# Altium PCB NB3000XN.PcbDoc (part 56 of 71)
Units mil, origin at the board's own origin, x right, y up, seen from the top; angles counter-clockwise.
Board outline 9527.56 x 6929.77 mil, 6 copper layers (Top Layer, GND+SHIELD, MidLayer1, MidLayer2, P2 - 3V3+5V0, Bottom Layer), stack 62.375 mil thick; 832 components, 1027 nets, 4655 pads, 4981 vias.
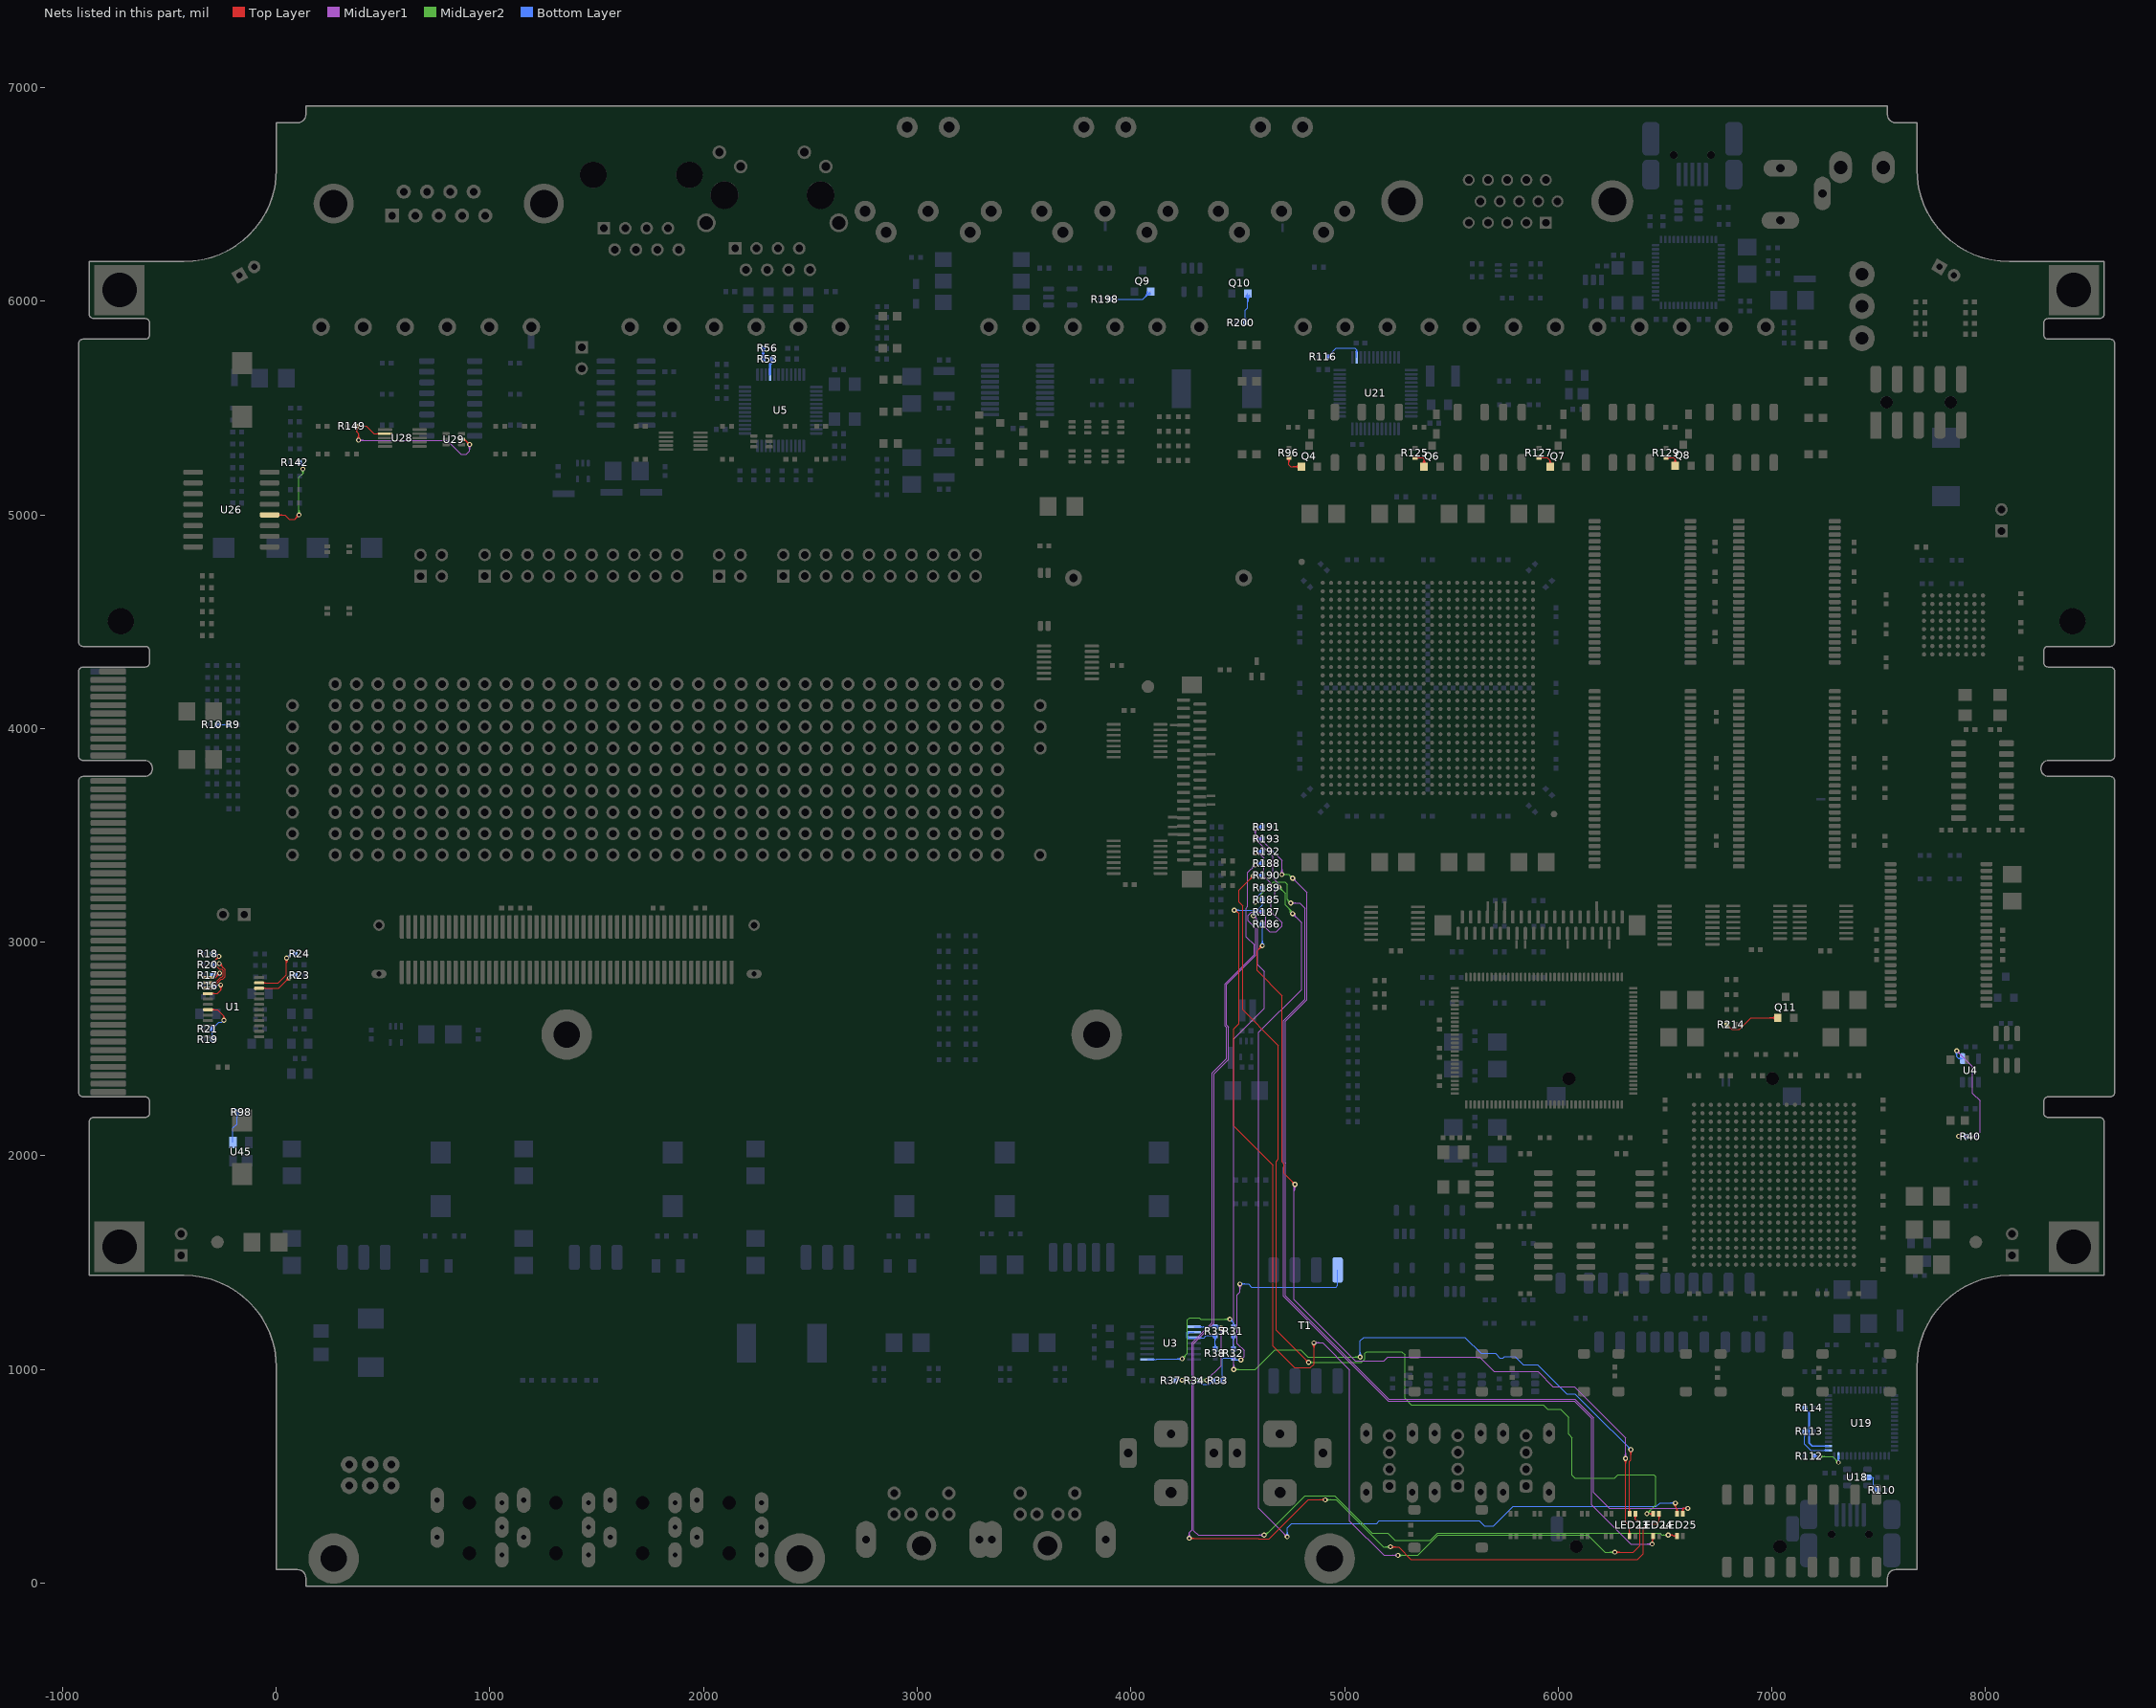
[diagram p60: the nets of this part, all layers, seen from the top]

## Via types
v1: diameter 23, hole 11.81, Top Layer to Bottom Layer, 3672 vias
v2: diameter 26, hole 11.81, Top Layer to Bottom Layer, 461 vias
v3: diameter 19, hole 11.81, Top Layer to Bottom Layer, tented both sides, 396 vias
v4: diameter 23.62, hole 11.81, Top Layer to Bottom Layer, 288 vias
v5: diameter 20, hole 11.81, Top Layer to Bottom Layer, 91 vias
v6: diameter 23, hole 11.81, Top Layer to Bottom Layer, tented both sides, 50 vias
v7: diameter 31, hole 11.81, Top Layer to Bottom Layer, 15 vias
v8: diameter 27.56, hole 11.81, Top Layer to Bottom Layer, tented both sides, 4 vias
v9: diameter 29, hole 11.81, Top Layer to Bottom Layer, 3 vias
v10: diameter 21, hole 11.81, Top Layer to Bottom Layer, 1 vias

## Nets (pads, with @x,y where several pads share a name; then routed paths per layer and width w, separated by ;. In a path a pad name is that pad's centre, name@x,y a point inside that pad or via, vN(x,y) a via of type N, cw(c..) or ccw(c..) an arc to the next point about the centre after c; other vN are vias at no path point) (continued)
NetLED23_1: LED23.1 R185.1 | length 5760.9
  Top Layer w4: v1(4483.52,3150.04) 4490.19,3150.04 4507.19,3133.04 4507.19,2620.02 4481.86,2594.69 4481.86,2138.73 4664.71,1955.87 4664.71,1108.85 4765.19,1008.37 4840.19,1008.37 4856.86,1025.04 v1(4856.86,1125.04) ; v1@4483.55,3148.54 cw(c4483.89,3129.71) 4497.2,3143.03 ; v1@4483.62,3144.54 cw(c4484.12,3116.63) 4503.86,3136.37 ; v1@4493.02,3150.04 ccw(c4499.87,3150.04) 4495.03,3145.2 ; v1@4850.14,1118.32 cw(c4833.92,1102.11) 4856.86,1102.11 cw(c4879.79,1102.11) v1@4863.57,1118.32 ; v1@4852.97,1121.15 cw(c4843.58,1111.76) 4856.86,1111.76 cw(c4870.14,1111.76) v1@4860.75,1121.15 ; v1(6265,145) 6351.86,145 6381.86,175 6381.86,285 6371.86,295 6365,295 6360.79,299.21 LED23.1@6360.79,324.21 ; v1@6268.89,141.11 cw(c6278.28,131.72) 6278.28,145 cw(c6278.28,158.28) v1@6268.89,148.89 ; v1@6271.72,138.28 cw(c6287.93,122.06) 6287.93,145 cw(c6287.93,167.93) v1@6271.72,151.72 ; LED23.1@6355.94,314.44 cw(c6344.23,302.73) 6360.79,302.73 cw(c6377.35,302.73) LED23.1@6365.64,314.44
  MidLayer1 w4: v1(4856.86,1125.04) 4897.92,1125.04 5024.19,998.77 5024.19,290.81 5185,130 v1(5250,130) ; v1@4860.75,1121.15 cw(c4870.14,1111.76) 4870.14,1125.04 cw(c4870.14,1138.32) v1@4860.75,1128.93 ; v1@4863.57,1118.32 cw(c4879.79,1102.11) 4879.79,1125.04 cw(c4879.79,1147.98) v1@4863.57,1131.76 ; v1@5243.28,123.28 ccw(c5227.06,107.06) 5227.06,130 ccw(c5227.06,152.93) v1@5243.28,136.72 ; v1@5246.11,126.11 ccw(c5236.72,116.72) 5236.72,130 ccw(c5236.72,143.28) v1@5246.11,133.89
  MidLayer2 w4: v1(5250,130) 5342.78,130 5438.48,225.71 6139.29,225.71 6220,145 v1(6265,145) ; v1@5253.89,126.11 cw(c5263.28,116.72) 5263.28,130 cw(c5263.28,143.28) v1@5253.89,133.89 ; v1@5256.72,123.28 cw(c5272.93,107.06) 5272.93,130 cw(c5272.93,152.93) v1@5256.72,136.72 ; v1@6258.28,138.28 ccw(c6242.06,122.06) 6242.06,145 ccw(c6242.06,167.93) v1@6258.28,151.72 ; v1@6261.11,141.11 ccw(c6251.72,131.72) 6251.72,145 ccw(c6251.72,158.28) v1@6261.11,148.89
  Bottom Layer w4: v1(4483.52,3150.04) 4590.19,3150.04 4615.19,3175.04 ; v1@4487.41,3146.15 cw(c4496.8,3136.76) 4496.8,3150.04 cw(c4496.8,3163.32) v1@4487.41,3153.93 ; v1@4490.24,3143.32 cw(c4506.46,3127.11) 4506.46,3150.04 cw(c4506.46,3172.98) v1@4490.24,3156.76 ; R185.1@4607.75,3191.19 cw(c4593.87,3175) 4615.19,3175 ; R185.1@4610.36,3194.22 cw(c4601.33,3183.7) 4615.19,3183.7 ; R185.1@4613.82,3198.75 4613.82,3200.04 R185.1@4615.19,3200.04 ; 4615.19,3179.07 cw(c4633.01,3179.07) R185.1@4620.41,3191.67 ; R185.1@4615.19,3198.75 4615.19,3175.04
NetLED23_3: LED23.3 R186.1 | length 4572.2
  Top Layer w4: v1@4605.69,2983.37 cw(c4582.76,2983.37) 4598.97,2967.16 cw(c4615.19,2950.94) v1@4615.19,2973.87 ; v1@4609.69,2983.37 cw(c4596.41,2983.37) 4605.8,2973.99 cw(c4615.19,2964.6) v1@4615.19,2977.87 ; v1(4615.19,2983.37) 4590.19,2958.37 4590.19,2866.71 4706.86,2750.04 4706.86,1971.86 4716.34,1962.38 4716.34,1918.56 v1(4768.19,1866.71) ; v1@4758.69,1866.71 ccw(c4735.76,1866.71) 4751.97,1882.93 ccw(c4768.19,1899.14) v1@4768.19,1876.21 ; v1@4762.69,1866.71 ccw(c4749.41,1866.71) 4758.8,1876.1 ccw(c4768.19,1885.49) v1@4768.19,1872.21 ; v1@6308.47,576.66 cw(c6292.26,560.44) 6315.19,560.44 cw(c6338.13,560.44) v1@6321.91,576.66 ; v1@6311.3,579.49 cw(c6301.91,570.1) 6315.19,570.1 cw(c6328.47,570.1) v1@6319.08,579.49 ; v1(6315.19,583.37) 6315.19,285 6333.59,266.6 LED23.3@6333.59,220.81 ; LED23.3@6328.74,230.58 ccw(c6317.03,242.29) 6333.59,242.29 ccw(c6350.15,242.29) LED23.3@6338.44,230.58
  MidLayer1 w4: v1@4761.47,1859.99 cw(c4753.69,1852.21) 4764.7,1852.21 ; 4764.7,1835.34 cw(c4799.56,1835.34) v1@4774.91,1859.99 ; 4764.7,1844.99 cw(c4789.9,1844.99) v1@4772.08,1862.82 ; 4764.7,1854.65 cw(c4780.25,1854.65) v1@4769.25,1865.65 ; v1(4768.19,1866.71) 4764.7,1863.21 4764.7,1326.14 5049.96,1040.87 5185.69,1040.87 5202.62,1057.81 5632.19,1057.81 5700,990 5905,990 5975,920 6075,920 6314.69,680.31 6314.69,583.87 v1(6315.19,583.37) ; v1@6308.47,590.09 ccw(c6293.46,605.1) 6314.69,605.1 ; v1@6311.3,587.26 ccw(c6303.12,595.45) 6314.69,595.45 ; 6314.69,597.86 ccw(c6329.68,597.86) v1@6319.08,587.26 ; 6314.69,607.52 ccw(c6339.33,607.52) v1@6321.91,590.09
  Bottom Layer w4: R186.1@4607.23,3077.92 cw(c4588.01,3058.7) 4615.19,3058.7 ; v1@4608.47,2990.09 ccw(c4592.26,3006.31) 4615.19,3006.31 ccw(c4638.13,3006.31) v1@4621.91,2990.09 ; R186.1@4610.06,3080.75 cw(c4597.67,3068.36) 4615.19,3068.36 ; v1@4611.3,2987.26 ccw(c4601.91,2996.65) 4615.19,2996.65 ccw(c4628.47,2996.65) v1@4619.08,2987.26 ; R186.1@4613.82,3085 4613.82,3084.51 4615.19,3084.51 v1(4615.19,2983.37) ; 4615.19,3065.32 cw(c4633.01,3065.32) R186.1@4620.41,3077.92
NetLED23_4: LED23.4 R187.1 | length 5308.4
  Top Layer w4: LED23.4@6328.84,333.98 ccw(c6317.81,345.01) 6333.41,345.01 ; LED23.4@6333.41,321.33 6333.41,570 6340.19,576.78 v1(6340.19,625.04) ; 6333.41,346.36 ccw(c6350.92,346.36) LED23.4@6338.54,333.98 ; v1@6333.47,618.32 cw(c6317.26,602.11) 6340.19,602.11 cw(c6363.13,602.11) v1@6346.91,618.32 ; v1@6336.3,621.15 cw(c6326.91,611.76) 6340.19,611.76 cw(c6353.47,611.76) v1@6344.08,621.15
  MidLayer1 w4: v1@4475.14,1006.76 ccw(c4458.92,1022.98) 4481.86,1022.98 ccw(c4504.79,1022.98) v1@4488.57,1006.76 ; v1@4477.97,1003.93 ccw(c4468.58,1013.32) 4481.86,1013.32 ccw(c4495.14,1013.32) v1@4485.75,1003.93 ; v1(4481.86,1000.04) 4481.86,2547.67 4623.86,2689.67 4623.86,2864.04 4593.19,2894.71 4593.19,3104.04 v1(4573.52,3123.71) ; v1@4573.52,3114.21 cw(c4573.52,3091.27) 4589.74,3107.49 cw(c4605.96,3123.71) v1@4583.02,3123.71 ; v1@4573.52,3118.21 cw(c4573.52,3104.93) 4582.91,3114.32 cw(c4592.3,3123.71) v1@4579.02,3123.71
  MidLayer2 w4: v1(4481.86,1000.04) 4583.19,1000.04 4674.86,1091.71 4795.54,1091.71 4828.88,1058.37 v1(5073.52,1058.37) ; v1@4485.75,996.15 cw(c4495.14,986.76) 4495.14,1000.04 cw(c4495.14,1013.32) v1@4485.75,1003.93 ; v1@4488.57,993.32 cw(c4504.79,977.11) 4504.79,1000.04 cw(c4504.79,1022.98) v1@4488.57,1006.76 ; v1@5066.81,1051.66 ccw(c5050.59,1035.44) 5050.59,1058.37 ccw(c5050.59,1081.31) v1@5066.81,1065.09 ; v1@5069.64,1054.49 ccw(c5060.25,1045.1) 5060.25,1058.37 ccw(c5060.25,1071.65) v1@5069.64,1062.26
  Bottom Layer w4: v1(4573.52,3123.71) 4591.69,3141.87 ; v1@4573.52,3129.21 ccw(c4573.52,3142.49) 4582.91,3133.1 ccw(c4592.3,3123.71) v1@4579.02,3123.71 ; v1@4573.52,3133.21 ccw(c4573.52,3156.14) 4589.74,3139.93 ccw(c4605.96,3123.71) v1@4583.02,3123.71 ; R187.1@4607.15,3135.36 ccw(c4591.69,3120.26) 4591.69,3141.87 ; R187.1@4607.15,3148.39 cw(c4591.69,3163.48) 4591.69,3141.87 ; R187.1@4610.01,3138.16 ccw(c4601.19,3129.54) 4601.19,3141.87 ccw(c4601.19,3154.21) R187.1@4610.01,3145.59 ; R187.1@4613.82,3141.88 4591.69,3141.87 ; v1@5066.81,1065.09 ccw(c5050.59,1081.31) 5073.52,1081.31 ccw(c5096.46,1081.31) v1@5080.24,1065.09 ; v1@5069.64,1062.26 ccw(c5060.25,1071.65) 5073.52,1071.65 ccw(c5086.8,1071.65) v1@5077.41,1062.26 ; v1(5073.52,1058.37) 5073.52,1133.52 5090,1150 5564.02,1150 5639.02,1075 5705.79,1075 5727.75,1053.04 5742.25,1053.04 5749.43,1060.22 5798.44,1060.22 5835.66,1023 5903.31,1023 6039.86,886.46 6078.78,886.46 6156.86,808.37 v1(6340.19,625.04) ; v1@6330.69,625.04 ccw(c6307.76,625.04) 6323.97,641.26 ccw(c6340.19,657.48) v1@6340.19,634.54 ; v1@6334.69,625.04 ccw(c6321.41,625.04) 6330.8,634.43 ccw(c6340.19,643.82) v1@6340.19,630.54
NetLED24_1: LED24.1 R188.1 | length 6494.6
  Top Layer w4: v1(4273.52,210) 4595,210 4598.57,206.43 4646.58,206.43 4830.15,390 v4(4910,390) ; v1@4277.41,206.11 cw(c4286.8,196.72) 4286.8,210 cw(c4286.8,223.28) v1@4277.41,213.89 ; v1@4280.24,203.28 cw(c4296.46,187.06) 4296.46,210 cw(c4296.46,232.93) v1@4280.24,216.72 ; v4@4903.06,383.06 ccw(c4886.31,366.31) 4886.31,390 ccw(c4886.31,413.69) v4@4903.06,396.94 ; v4@4905.89,385.89 ccw(c4895.97,375.97) 4895.97,390 ccw(c4895.97,404.03) v4@4905.89,394.11 ; v4(5215,170) 5253.14,170 5311.14,112 6372,112 6398.19,138.19 6398.19,258.19 6417.07,277.07 6458.89,277.07 6472.22,290.4 LED24.1@6472.22,321.33 ; v4@5219.11,165.89 cw(c5229.03,155.97) 5229.03,170 cw(c5229.03,184.03) v4@5219.11,174.11 ; v4@5221.94,163.06 cw(c5238.69,146.31) 5238.69,170 cw(c5238.69,193.69) v4@5221.94,176.94 ; LED24.1@6467.19,314.44 cw(c6455.05,302.3) 6472.22,302.3 ; 6472.22,303.16 cw(c6488.16,303.16) LED24.1@6476.89,314.44
  MidLayer1 w4: v1@4266.81,216.72 ccw(c4250.59,232.93) 4273.52,232.93 ccw(c4296.46,232.93) v1@4280.24,216.72 ; v1@4269.64,213.89 ccw(c4260.25,223.28) 4273.52,223.28 ccw(c4286.8,223.28) v1@4277.41,213.89 ; v1(4273.52,210) 4273.52,236.9 4286,249.37 4286,1124.69 4381.52,1220.21 4381.52,2388 4448.52,2455 4448.52,2600.04 4440.19,2608.37 4440.19,2804.71 4577.19,2941.71 4577.19,2988.04 4540.19,3025.04 4540.19,3159.71 4547.19,3166.71 4547.19,3326.37 v1(4581.86,3361.04) ; v1@4572.36,3361.04 cw(c4549.42,3361.04) 4565.64,3344.82 cw(c4581.86,3328.61) v1@4581.86,3351.54 ; v1@4576.36,3361.04 cw(c4563.08,3361.04) 4572.47,3351.65 cw(c4581.86,3342.26) v1@4581.86,3355.54
  MidLayer2 w4: v4(4910,390) 4961.55,390 5181.55,170 v4(5215,170) ; v4@4914.11,385.89 cw(c4924.03,375.97) 4924.03,390 cw(c4924.03,404.03) v4@4914.11,394.11 ; v4@4916.94,383.06 cw(c4933.69,366.31) 4933.69,390 cw(c4933.69,413.69) v4@4916.94,396.94 ; v4@5208.06,163.06 ccw(c5191.31,146.31) 5191.31,170 ccw(c5191.31,193.69) v4@5208.06,176.94 ; v4@5210.89,165.89 ccw(c5200.97,155.97) 5200.97,170 ccw(c5200.97,184.03) v4@5210.89,174.11
  Bottom Layer w4: v1@4579.73,3362.35 cw(c4592.31,3354.59) 4592.31,3369.37 ; v1(4581.86,3361.04) 4590.19,3369.37 R188.1@4613.82,3369.38 ccw(c4613.82,3341.32) v1@4589.94,3356.05 ; v1@4583.13,3360.25 cw(c4599.48,3350.17) 4599.48,3369.37 ; v1@4586.54,3358.15 cw(c4606.65,3345.74) R188.1@4606.65,3369.37 ; R188.1@4607.23,3362.79 ccw(c4591.32,3346.88) 4591.32,3369.37 ccw(c4591.32,3391.87) R188.1@4607.23,3375.96 ; R188.1@4610.06,3365.61 ccw(c4600.98,3356.53) 4600.98,3369.37 ccw(c4600.98,3382.22) R188.1@4610.06,3373.14
NetLED24_3: LED24.3 R189.1 | length 5102.6
  Top Layer w4: v1@6436.3,187.26 ccw(c6426.91,196.65) 6440.19,196.65 ccw(c6453.47,196.65) v1@6444.08,187.26 ; v1(6440.19,183.37) 6440.19,200 6444.84,204.65 ; LED24.3@6441.7,209.79 cw(c6439.06,204.65) 6444.84,204.65 ; LED24.3@6443.31,222.34 LED24.3@6444.66,223.69 ; LED24.3@6444.84,220.81 6444.84,204.65 ; LED24.3@6447.97,209.79 ccw(c6450.62,204.65) 6444.84,204.65
  MidLayer1 w4: v1(4748.52,3183.37) 4790.52,3183.37 4815.52,3158.37 4815.52,2733.37 4715.19,2633.04 4715.19,1963.52 4716.34,1962.38 4716.34,1947.62 4715.19,1946.48 4715.19,1341.71 5095.75,961.15 5204.9,852 6075.37,852 6156.86,770.52 6156.86,366.71 6340.19,183.37 v1(6440.19,183.37) ; v1@4752.41,3179.49 cw(c4761.8,3170.1) 4761.8,3183.37 cw(c4761.8,3196.65) v1@4752.41,3187.26 ; v1@4755.24,3176.66 cw(c4771.46,3160.44) 4771.46,3183.37 cw(c4771.46,3206.31) v1@4755.24,3190.09 ; v1@6433.47,176.66 ccw(c6417.26,160.44) 6417.26,183.37 ccw(c6417.26,206.31) v1@6433.47,190.09 ; v1@6436.3,179.49 ccw(c6426.91,170.1) 6426.91,183.37 ccw(c6426.91,196.65) v1@6436.3,187.26
  MidLayer2 w4: v1(4581.86,3187.37) 4609.24,3214.75 4609.24,3223.11 4668.5,3282.37 4720.21,3282.37 4731.52,3271.06 4731.52,3200.37 v1(4748.52,3183.37) ; v1@4581.86,3192.87 ccw(c4581.86,3206.15) 4591.25,3196.76 ccw(c4600.64,3187.37) v1@4587.36,3187.37 ; v1@4581.86,3196.87 ccw(c4581.86,3219.81) 4598.07,3203.59 ccw(c4614.29,3187.37) v1@4591.36,3187.37 ; v1@4739.02,3183.37 ccw(c4716.09,3183.37) 4732.31,3199.59 ccw(c4748.52,3215.81) v1@4748.52,3192.87 ; v1@4743.02,3183.37 ccw(c4729.75,3183.37) 4739.14,3192.76 ccw(c4748.52,3202.15) v1@4748.52,3188.87
  Bottom Layer w4: v1@4577.1,3195.6 ccw(c4572.32,3203.85) 4581.86,3203.85 ; v1(4581.86,3187.37) 4581.86,3203.85 ; v1@4586.62,3195.6 cw(c4591.4,3203.85) 4581.86,3203.85 ; R189.1@4608.02,3247.84 cw(c4598.46,3235.81) 4613.82,3235.81 ; R189.1@4613.82,3255.62 4613.82,3235.81 ; R189.1@4619.62,3247.84 ccw(c4629.18,3235.81) 4613.82,3235.81 ; 4581.86,3203.85 4613.82,3235.81
NetLED24_4: LED24.4 R190.1 | length 5308.6
  Top Layer w4: v1@4564.02,3310.04 cw(c4541.09,3310.04) 4557.31,3293.82 cw(c4573.52,3277.61) v1@4573.52,3300.54 ; v1@4568.02,3310.04 cw(c4554.75,3310.04) 4564.14,3300.65 cw(c4573.52,3291.26) v1@4573.52,3304.54 ; v1(4573.52,3310.04) 4506.52,3243.04 4506.52,3188.04 4523.52,3171.04 4523.52,2683.37 4669.72,2537.18 4690.52,2516.37 4690.52,1984.48 4680.71,1974.66 4680.71,1184.52 v1(4831.86,1033.37) ; v1@4822.36,1033.37 ccw(c4799.42,1033.37) 4815.64,1049.59 ccw(c4831.86,1065.81) v1@4831.86,1042.87 ; v1@4826.36,1033.37 ccw(c4813.08,1033.37) 4822.47,1042.76 ccw(c4831.86,1052.15) v1@4831.86,1038.87 ; v1(6415.19,325.04) 6429.96,325.04 6430.79,324.21 ; LED24.4@6439.55,319.96 ccw(c6430.79,313.05) 6430.79,324.21 ; LED24.4@6439.55,328.45 cw(c6430.79,335.36) 6430.79,324.21 ; LED24.4@6444.94,324.21 6430.79,324.21
  MidLayer2 w4: v1(4831.86,1033.37) 5080,1033.37 5095,1048.37 5095,1075 5103.37,1083.37 5267.56,1083.37 5282.19,1068.75 5282.19,864.67 5311.98,834.87 5930.13,834.87 5950,815 6010,815 6048.65,776.35 6048.65,696.54 6065.19,680 6065.19,505.04 6078.52,491.71 6263.86,491.71 6280.52,508.37 6446.86,508.37 6456.86,498.37 6456.86,366.71 v1(6415.19,325.04) ; v1@4835.75,1029.49 cw(c4845.14,1020.1) 4845.14,1033.37 cw(c4845.14,1046.65) v1@4835.75,1037.26 ; v1@4838.57,1026.66 cw(c4854.79,1010.44) 4854.79,1033.37 cw(c4854.79,1056.31) v1@4838.57,1040.09 ; 6424.58,334.43 cw(c6415.19,343.82) 6415.19,330.54 ccw(c6415.19,343.82) 6424.58,334.43 ; 6424.58,334.43 ccw(c6433.97,325.04) 6420.69,325.04 cw(c6433.97,325.04) 6424.58,334.43 ; 6431.41,341.26 cw(c6415.19,357.48) 6415.19,334.54 ccw(c6415.19,357.48) 6431.41,341.26 ; 6431.41,341.26 ccw(c6447.63,325.04) 6424.69,325.04 cw(c6447.63,325.04) 6431.41,341.26
  Bottom Layer w4: v1(4573.52,3310.04) 4580.19,3310.04 4582.65,3312.5 R190.1@4613.82,3312.5 ; v1@4577.41,3306.15 cw(c4592.74,3290.83) 4592.74,3312.5 ; v1@4580.24,3303.32 cw(c4602.4,3281.17) 4602.4,3312.5 ; v1@4580.24,3316.76 ccw(c4590.52,3327.04) 4590.52,3312.5 ; R190.1@4607.23,3305.91 ccw(c4591.32,3290) 4591.32,3312.5 ccw(c4591.32,3335) R190.1@4607.23,3319.09 ; R190.1@4610.06,3308.74 ccw(c4600.98,3299.66) 4600.98,3312.5 ccw(c4600.98,3325.34) R190.1@4610.06,3316.26
NetLED25_1: LED25.1 R191.1 | length 5492.9
  Top Layer w4: LED25.1@6578.43,333.98 ccw(c6566.73,345.69) 6583.28,345.69 ccw(c6599.84,345.69) LED25.1@6588.13,333.98 ; LED25.1@6583.28,324.21 6583.28,348.19 6585.13,350.04 ; v1@6599.88,343.59 ccw(c6585.13,329.95) 6585.13,350.04 ; v1@6599.88,356.49 cw(c6585.13,370.13) 6585.13,350.04 ; v1@6602.82,346.31 ccw(c6594.28,338.41) 6594.28,350.04 ccw(c6594.28,361.67) v1@6602.82,353.78 ; v1(6606.86,350.04) 6585.13,350.04
  MidLayer1 w4: v1@4575.14,3525.66 cw(c4558.92,3509.44) 4581.86,3509.44 cw(c4604.79,3509.44) v1@4588.57,3525.66 ; v1@4577.97,3528.49 cw(c4568.58,3519.1) 4581.86,3519.1 cw(c4595.14,3519.1) v1@4585.75,3528.49 ; v1(4581.86,3532.37) 4581.86,3508.37 4706.86,3383.37 v1(4706.86,3316.71) ; v1@4700.14,3323.43 ccw(c4683.92,3339.64) 4706.86,3339.64 ccw(c4729.79,3339.64) v1@4713.57,3323.43 ; v1@4702.97,3320.6 ccw(c4693.58,3329.99) 4706.86,3329.99 ccw(c4720.14,3329.99) v1@4710.75,3320.6 ; v1@4756.86,3290.54 cw(c4756.86,3267.61) 4773.07,3283.82 cw(c4789.29,3300.04) v1@4766.36,3300.04 ; v1@4756.86,3294.54 cw(c4756.86,3281.26) 4766.25,3290.65 cw(c4775.64,3300.04) v1@4762.36,3300.04 ; v1(4756.86,3300.04) 4823.52,3233.37 4823.52,2730.06 4723.19,2629.73 4723.19,1966.84 4724.34,1965.69 4724.34,1944.31 4723.19,1943.16 4723.19,1345.02 5208.21,860 6078.69,860 6165.19,773.5 6165.19,425.04 6240.19,350.04 v1(6606.86,350.04) ; v1@6600.14,343.32 ccw(c6583.92,327.11) 6583.92,350.04 ccw(c6583.92,372.98) v1@6600.14,356.76 ; v1@6602.97,346.15 ccw(c6593.58,336.76) 6593.58,350.04 ccw(c6593.58,363.32) v1@6602.97,353.93
  MidLayer2 w4: v1(4706.86,3316.71) 4740.19,3316.71 v1(4756.86,3300.04) ; v1@4710.75,3312.82 cw(c4720.14,3303.43) 4720.14,3316.71 cw(c4720.14,3329.99) v1@4710.75,3320.6 ; v1@4713.57,3309.99 cw(c4729.79,3293.77) 4729.79,3316.71 cw(c4729.79,3339.64) v1@4713.57,3323.43 ; v1@4747.36,3300.04 ccw(c4724.42,3300.04) 4740.64,3316.26 ccw(c4756.86,3332.48) v1@4756.86,3309.54 ; v1@4751.36,3300.04 ccw(c4738.08,3300.04) 4747.47,3309.43 ccw(c4756.86,3318.82) v1@4756.86,3305.54
  Bottom Layer w4: v1@4579.78,3533.76 cw(c4591.42,3526.01) 4591.42,3540 ; v1(4581.86,3532.37) 4581.86,3533.37 4588.48,3540 R191.1@4613.82,3540 ccw(c4613.82,3511.11) v1@4589.77,3527.11 ; v1@4583.11,3531.54 cw(c4598.89,3521.05) 4598.89,3540 ; v1@4586.44,3529.33 cw(c4606.35,3516.08) R191.1@4606.35,3540 ; R191.1@4607.23,3533.41 ccw(c4591.32,3517.5) 4591.32,3540 ccw(c4591.32,3562.5) R191.1@4607.23,3546.59 ; R191.1@4610.06,3536.24 ccw(c4600.98,3527.16) 4600.98,3540 ccw(c4600.98,3552.84) R191.1@4610.06,3543.76
NetLED25_3: LED25.3 R192.1 | length 6560.1
  Top Layer w4: v1(6515.19,225.04) 6535,225.04 ; v1@6522.6,219.09 cw(c6535,209.14) 6535,225.04 ; v1@6522.6,230.99 ccw(c6535,240.94) 6535,225.04 ; 6536.35,223.69 6535,225.04 ; LED25.3@6551.23,215.96 ccw(c6539.53,204.25) 6539.53,220.81 ccw(c6539.53,237.36) LED25.3@6551.23,225.66 ; LED25.3@6556.08,220.81 6539.23,220.81 6535,225.04
  MidLayer1 w4: v1(4581.86,3418.71) 4598.52,3418.71 ; v1@4590.03,3413.87 cw(c4598.52,3408.84) 4598.52,3418.71 ; v1@4590.03,3423.55 ccw(c4598.52,3428.58) 4598.52,3418.71 ; v1@4616.81,218.32 ccw(c4600.59,202.11) 4600.59,225.04 ccw(c4600.59,247.98) v1@4616.81,231.76 ; v1@4619.64,221.15 ccw(c4610.25,211.76) 4610.25,225.04 ccw(c4610.25,238.32) v1@4619.64,228.93 ; v1(4623.52,225.04) 4315,225.04 4294,246.04 4294,970 4294,1121.37 4389.52,1216.9 4389.52,2384.69 4456.86,2452.02 4456.86,2603.02 4448.52,2611.35 4448.52,2801.73 4585.19,2938.39 4585.19,3063.37 4548.52,3100.04 4548.52,3125.04 4565.19,3141.71 4615.19,3141.71 4631.86,3125.04 4631.86,3066.71 4648.52,3050.04 4681.86,3050.04 4706.86,3075.04 4706.86,3091.71 4656.86,3141.71 4656.86,3200.04 4673.52,3216.71 4673.52,3258.37 4623.52,3308.37 4623.52,3393.71 4598.52,3418.71
  MidLayer2 w4: v1(4623.52,225.04) 4631.86,225.04 4814.63,407.81 4955.05,407.81 5127.67,235.19 5202.06,235.19 5236.88,200.37 5401.84,200.37 5435.17,233.71 6476.33,233.71 6485,225.04 v1(6515.19,225.04) ; v1@4623.52,226.54 ccw(c4623.52,250.28) 4640.31,233.49 ; v1@4623.52,230.54 ccw(c4623.52,263.94) 4647.14,240.32 ; v1@4623.52,234.54 ccw(c4623.52,277.59) 4653.97,247.15 ; v1@6508.47,218.32 ccw(c6492.26,202.11) 6492.26,225.04 ccw(c6492.26,247.98) v1@6508.47,231.76 ; v1@6511.3,221.15 ccw(c6501.91,211.76) 6501.91,225.04 ccw(c6501.91,238.32) v1@6511.3,228.93
  Bottom Layer w4: v1(4581.86,3418.71) 4588.19,3425.04 R192.1@4613.82,3425.04 ; v1@4583.05,3417.8 cw(c4597.67,3406.67) 4597.67,3425.04 ; v1@4586.23,3415.38 cw(c4605.74,3400.52) R192.1@4605.74,3425.04 ; v1@4589.42,3412.95 cw(c4613.82,3394.37) R192.1@4613.82,3425.04 ; v1@4589.59,3425.04 ccw(c4589.59,3449.99) R192.1@4607.23,3432.35 ; 4593.05,3425.04 cw(c4593.05,3404.99) R192.1@4607.23,3419.17 ; 4599.25,3425.04 ccw(c4599.25,3440.33) R192.1@4610.06,3429.52 ; R192.1@4613.82,3426.25 R192.1@4613.82,3425.04
NetLED25_4: LED25.4 R193.1 | length 6150.4
  Top Layer w4: v1@6543.2,366.51 cw(c6536.41,356.48) 6548.52,356.48 ; v1(6548.52,374.37) 6548.52,356.48 ; LED25.4@6551.33,333.98 ccw(c6539.63,345.69) 6556.18,345.69 ccw(c6572.74,345.69) LED25.4@6561.03,333.98 ; v1@6553.85,366.51 ccw(c6560.63,356.48) 6548.52,356.48 ; LED25.4@6556.18,324.21 6556.18,348.82 6548.52,356.48 ; LED25.4@6556.86,321.33 LED25.4@6556.86,324.21
  MidLayer1 w4: v1@4581.86,3473.87 cw(c4581.86,3450.94) 4598.07,3467.16 cw(c4614.29,3483.37) v1@4591.36,3483.37 ; v1@4581.86,3477.87 cw(c4581.86,3464.6) 4591.25,3473.99 cw(c4600.64,3483.37) v1@4587.36,3483.37 ; v1(4581.86,3483.37) 4665.19,3400.04 4665.19,3300.04 4692.86,3272.37 v1(4692.86,3258.37) ; v1@4722.36,216.71 ccw(c4699.42,216.71) 4715.64,232.93 ccw(c4731.86,249.14) v1@4731.86,226.21 ; v1@4726.36,216.71 ccw(c4713.08,216.71) 4722.47,226.1 ccw(c4731.86,235.49) v1@4731.86,222.21 ; v1(4731.86,216.71) 4632.6,315.97 4598.52,350.04 4598.52,2578.02 4799.52,2779.02 4799.52,3090.71 v1(4756.86,3133.37) ; v1@4756.86,3123.87 cw(c4756.86,3100.94) 4773.07,3117.16 cw(c4789.29,3133.37) v1@4766.36,3133.37 ; v1@4756.86,3127.87 cw(c4756.86,3114.6) 4766.25,3123.99 cw(c4775.64,3133.37) v1@4762.36,3133.37
  MidLayer2 w4: v1@4692.86,3248.87 cw(c4692.86,3225.94) 4709.07,3242.16 cw(c4725.29,3258.37) v1@4702.36,3258.37 ; v1@4692.86,3252.87 cw(c4692.86,3239.6) 4702.25,3248.99 cw(c4711.64,3258.37) v1@4698.36,3258.37 ; v1(4692.86,3258.37) 4723.52,3227.71 4723.52,3175.04 4756.86,3141.71 v1(4756.86,3133.37) ; 4734.75,3163.82 cw(c4704.3,3133.37) v1@4747.36,3133.37 ; 4741.58,3156.99 cw(c4717.96,3133.37) v1@4751.36,3133.37 ; 4748.4,3150.16 cw(c4731.62,3133.37) v1@4755.36,3133.37
  Bottom Layer w4: v1(4581.86,3483.37) 4613.15,3483.37 4613.61,3482.92 4613.82,3482.71 4613.82,3482.63 R193.1@4613.82,3483.12 ; v1@4585.75,3479.49 cw(c4595.14,3470.1) 4595.14,3483.37 cw(c4595.14,3496.65) v1@4585.75,3487.26 ; v1@4588.57,3476.66 cw(c4604.79,3460.44) 4604.79,3483.37 cw(c4604.79,3506.31) v1@4588.57,3490.09 ; v1@4590.74,3483.37 ccw(c4590.74,3506.7) R193.1@4607.23,3490.21 ; v1@4591.91,3483.37 cw(c4591.91,3461.7) R193.1@4607.23,3477.03 ; 4600.39,3483.37 ccw(c4600.39,3497.04) R193.1@4610.06,3487.38 ; 4601.56,3483.37 cw(c4601.56,3471.36) R193.1@4610.06,3479.86 ; v1@4725.14,223.43 ccw(c4708.92,239.64) 4731.86,239.64 ccw(c4754.79,239.64) v1@4738.57,223.43 ; v1@4727.97,220.6 ccw(c4718.58,229.99) 4731.86,229.99 ccw(c4745.14,229.99) v1@4735.75,220.6 ; v1(4731.86,216.71) 4731.86,258.4 4752.64,279.19 5150.69,279.19 5163.21,291.71 5630,291.71 5655,266.71 5698.52,266.71 5790.19,358.37 6460,358.37 6476,374.37 v1(6548.52,374.37) ; 6525.59,374.37 cw(c6525.59,351.44) 6541.81,367.66 ccw(c6525.59,351.44) 6525.59,374.37 ; 6525.59,374.37 ccw(c6525.59,397.31) 6541.81,381.09 cw(c6525.59,397.31) 6525.59,374.37 ; 6535.25,374.37 cw(c6535.25,361.1) 6544.64,370.49 ccw(c6535.25,361.1) 6535.25,374.37 ; 6535.25,374.37 ccw(c6535.25,387.65) 6544.64,378.26 cw(c6535.25,387.65) 6535.25,374.37
NetQ4_1: Q4.1 R96.2 | length 284.7
  Top Layer w4: R96.2@4733.41,5262.23 cw(c4717.5,5246.32) 4740,5246.32 cw(c4762.5,5246.32) R96.2@4746.59,5262.23 ; R96.2@4736.24,5265.06 cw(c4727.16,5255.98) 4740,5255.98 cw(c4752.84,5255.98) R96.2@4743.76,5265.06 ; R96.2@4740,5268.82 4740,5233.79 4748,5225.79 Q4.1@4797.6,5225.79 ; Q4.1@4786.49,5214.67 ccw(c4759.66,5187.85) 4759.66,5225.79 ccw(c4759.65,5263.73) Q4.1@4786.49,5236.9 ; Q4.1@4789.31,5217.5 ccw(c4769.31,5197.5) 4769.31,5225.79 ccw(c4769.31,5254.07) Q4.1@4789.31,5234.07 ; Q4.1@4792.14,5220.33 ccw(c4778.97,5207.16) 4778.97,5225.79 ccw(c4778.97,5244.42) Q4.1@4792.14,5231.24
NetQ6_1: Q6.1 R125.2 | length 231.7
  Top Layer w4: R125.2@5330,5268.82 5366.18,5268.82 5372.6,5262.4 ; R125.2@5334.25,5265.06 cw(c5343.33,5255.98) 5343.33,5268.82 cw(c5343.33,5281.66) R125.2@5334.25,5272.58 ; R125.2@5337.08,5262.23 cw(c5352.99,5246.32) 5352.99,5268.82 cw(c5352.99,5291.32) R125.2@5337.08,5275.41 ; Q6.1@5362,5238.38 ccw(c5340.07,5262.4) 5372.6,5262.4 ; Q6.1@5364.7,5235.42 ccw(c5348.35,5253.33) 5372.6,5253.33 ccw(c5396.85,5253.33) Q6.1@5380.5,5235.42 ; Q6.1@5372.6,5225.79 5372.6,5262.4 ; Q6.1@5383.19,5238.38 cw(c5405.12,5262.4) 5372.6,5262.4
NetQ7_1: Q7.1 R127.2 | length 205.1
  Top Layer w4: R127.2@5910,5268.82 5948.78,5268.82 5962.6,5255 Q7.1@5962.6,5225.79 ; R127.2@5914.25,5265.06 cw(c5923.33,5255.98) 5923.33,5268.82 cw(c5923.33,5281.66) R127.2@5914.25,5272.58 ; R127.2@5917.08,5262.23 cw(c5932.99,5246.32) 5932.99,5268.82 cw(c5932.99,5291.32) R127.2@5917.08,5275.41 ; Q7.1@5954.32,5240.13 ccw(c5945.11,5255) 5962.6,5255 ccw(c5980.09,5255) Q7.1@5970.88,5240.13 ; Q7.1@5956.43,5236.73 ccw(c5949.56,5247.81) 5962.6,5247.81 ccw(c5975.64,5247.81) Q7.1@5968.77,5236.73
NetQ8_1: Q8.1 R129.2 | length 197.2
  Top Layer w4: R129.2@6505,5268.82 6539.6,5268.82 6547.6,5260.82 ; R129.2@6509.25,5265.06 cw(c6518.33,5255.98) 6518.33,5268.82 cw(c6518.33,5281.66) R129.2@6509.25,5272.58 ; R129.2@6512.08,5262.23 cw(c6527.99,5246.32) 6527.99,5268.82 cw(c6527.99,5291.32) R129.2@6512.08,5275.41 ; Q8.1@6539,5244.93 ccw(c6528.62,5260.82) 6547.6,5260.82 ; Q8.1@6541.19,5241.58 ccw(c6533.45,5253.43) 6547.6,5253.43 ccw(c6561.75,5253.42) Q8.1@6554.01,5241.58 ; Q8.1@6547.6,5230.79 6547.6,5260.82 ; Q8.1@6556.2,5244.93 cw(c6566.58,5260.82) 6547.6,5260.82
NetQ9_1: Q9.1 R198.2 | length 382.1
  Bottom Layer w4: R198.2@3901.18,6010 4056.61,6010 Q9.1@4092.4,6045.79 ; R198.2@3904.94,6006.24 cw(c3914.02,5997.16) 3914.02,6010 cw(c3914.02,6022.84) R198.2@3904.94,6013.76 ; R198.2@3907.77,6003.41 cw(c3923.68,5987.5) 3923.68,6010 cw(c3923.68,6032.5) R198.2@3907.77,6016.59 ; 4063.89,6017.28 cw(c4092.4,5988.77) Q9.1@4092.4,6029.09 ; 4066.27,6019.65 ccw(c4041.12,6044.8) Q9.1@4076.69,6044.8 ; 4070.72,6024.11 cw(c4092.4,6002.42) Q9.1@4092.4,6033.09 ; 4073.1,6026.48 ccw(c4054.78,6044.8) Q9.1@4080.69,6044.8 ; Q9.1@4077.55,6030.93 cw(c4092.4,6016.08) Q9.1@4092.4,6037.09
NetQ10_1: Q10.1 R200.2 | length 329.2
  Bottom Layer w4: R200.2@4529.59,5907.08 ccw(c4513.68,5922.99) 4536.18,5922.99 ccw(c4558.68,5922.99) R200.2@4542.77,5907.08 ; R200.2@4532.42,5904.25 ccw(c4523.34,5913.33) 4536.18,5913.33 ccw(c4549.02,5913.33) R200.2@4539.94,5904.25 ; R200.2@4536.18,5900 4536.18,5958.37 4547.4,5969.6 Q10.1@4547.4,6035.79 ; Q10.1@4536.29,6023.69 cw(c4509.46,5996.86) 4547.4,5996.86 cw(c4585.34,5996.86) Q10.1@4558.51,6023.69 ; Q10.1@4539.12,6026.52 cw(c4519.11,6006.52) 4547.4,6006.52 cw(c4575.69,6006.52) Q10.1@4555.69,6026.52 ; Q10.1@4541.95,6029.35 cw(c4528.77,6016.17) 4547.4,6016.17 cw(c4566.03,6016.18) Q10.1@4552.86,6029.35
NetQ11_1: Q11.1 R214.1 | length 459.6
  Top Layer w4: R214.1@6788.82,2605.19 cw(c6788.82,2581.5) 6805.57,2598.25 ; R214.1@6788.82,2609.19 cw(c6788.82,2595.16) R214.1@6798.74,2605.08 ; R214.1@6788.82,2615 6812.11,2591.71 6848.52,2591.71 6902.6,2645.79 Q11.1@7027.6,2645.79 ; R214.1@6794.14,2614.51 ccw(c6805.79,2614.51) R214.1@6797.55,2606.27 ; R214.1@6798.14,2614.51 ccw(c6819.45,2614.51) 6804.38,2599.44 ; Q11.1@7016.49,2634.67 ccw(c6989.66,2607.85) 6989.66,2645.79 ccw(c6989.65,2683.73) Q11.1@7016.49,2656.9 ; Q11.1@7019.31,2637.5 ccw(c6999.31,2617.5) 6999.31,2645.79 ccw(c6999.31,2674.07) Q11.1@7019.31,2654.07 ; Q11.1@7022.14,2640.33 ccw(c7008.97,2627.16) 7008.97,2645.79 ccw(c7008.97,2664.42) Q11.1@7022.14,2651.24
NetR9_2: R9.2 R10.1 | length 168.7
  Bottom Layer w4: R10.1@-278.82,4017.73 R9.2@-221.18,4017.73 ; R10.1@-275.06,4013.97 cw(c-265.98,4004.89) -265.98,4017.73 cw(c-265.98,4030.57) R10.1@-275.06,4021.49 ; R10.1@-272.23,4011.14 cw(c-256.32,3995.23) -256.32,4017.73 cw(c-256.32,4040.23) R10.1@-272.23,4024.32 ; R9.2@-227.77,4011.14 ccw(c-243.68,3995.23) -243.68,4017.73 ccw(c-243.68,4040.23) R9.2@-227.77,4024.32 ; R9.2@-224.94,4013.97 ccw(c-234.02,4004.89) -234.02,4017.73 ccw(c-234.02,4030.57) R9.2@-224.94,4021.49
NetR16_1: R16.1 U1.4 | length 234
  Top Layer w4: U1.4@-320,2759.41 -275.59,2759.41 -260,2775 -260,2799.85 v1(-259.81,2800.04) ; U1.4@-300.26,2755.81 cw(c-291.58,2747.13) -291.58,2759.41 cw(c-291.58,2771.69) U1.4@-300.26,2763.01 ; v1@-266.53,2793.32 cw(c-282.29,2777.56) -260,2777.56 ; v1@-263.7,2796.15 cw(c-272.63,2787.22) -260,2787.22 ; -260,2776.65 cw(c-236.42,2776.65) v1@-253.09,2793.32 ; -260,2786.3 cw(c-246.07,2786.3) v1@-255.92,2796.15
  Bottom Layer w4: R16.1@-298.82,2795 -280.48,2795 ; R16.1@-291.29,2789.5 cw(c-280.48,2781.61) -280.48,2795 ; R16.1@-291.29,2800.5 ccw(c-280.48,2808.39) -280.48,2795 ; v1(-259.81,2800.04) -275.43,2800.04 -280.48,2795
NetR17_1: R17.1 U1.1 | length 356.2
  Top Layer w4: U1.1@-320,2835 -285,2835 v1(-265,2855) v1@-264.77,2855 ; U1.1@-300.26,2831.4 cw(c-291.58,2822.72) -291.58,2835 cw(c-291.58,2847.28) U1.1@-300.26,2838.6 ; v1@-274.5,2855 cw(c-297.44,2855) -281.22,2838.78 cw(c-265,2822.56) v1@-265,2845.5 ; v1@-270.5,2855 cw(c-283.78,2855) -274.39,2845.61 cw(c-265,2836.22) v1@-265,2849.5
  Bottom Layer w4: R17.1@-295.06,2841.24 cw(c-285.98,2832.16) -285.98,2845 cw(c-285.98,2857.84) R17.1@-295.06,2848.76 ; R17.1@-292.23,2838.41 cw(c-276.32,2822.5) -276.32,2845 cw(c-276.32,2867.5) R17.1@-292.23,2851.59 ; R17.1@-291.88,2845 ccw(c-291.88,2870.56) v1@-269.76,2857.76 ; -284.94,2845 ccw(c-284.94,2866.54) v1@-266.3,2855.75 ; -278.01,2845 ccw(c-278.01,2862.53) v1@-262.84,2853.75 ; v1@-273.22,2859.76 cw(c-298.82,2874.57) R17.1@-298.82,2845 -265,2845 -264.85,2845 -259.93,2849.93 -259.81,2850.04 -264.77,2855 v1(-265,2855) ; -271.07,2845 ccw(c-271.07,2858.51) v1@-259.37,2851.74
NetR18_2: R18.2 U1.2 | length 346.2
  Top Layer w4: U1.2@-320,2809.8 -286.11,2809.8 -260.16,2835.75 -254.25,2835.75 -247.5,2842.5 -247.5,2868.23 -254.27,2875 -266.18,2875 -283.98,2892.79 -283.98,2917.54 ; U1.2@-300.26,2806.21 cw(c-291.58,2797.52) -291.58,2809.8 cw(c-291.58,2822.08) U1.2@-300.26,2813.4 ; v1@-277.31,2933.69 cw(c-300.07,2933.63) -283.98,2917.54 ; v1@-273.31,2933.7 cw(c-286.48,2933.67) -277.17,2924.35 cw(c-267.85,2915.03) v1@-267.82,2928.21 ; v1@-267.83,2924.21 ccw(c-267.88,2901.45) -283.98,2917.54 ; v1(-267.81,2933.71) -283.98,2917.54
  Bottom Layer w4: R18.2@-298.82,2945 -279.1,2945 ; R18.2@-291.62,2939.08 cw(c-279.1,2928.8) -279.1,2945 ; R18.2@-291.62,2950.92 ccw(c-279.1,2961.2) -279.1,2945 ; v1(-267.81,2933.71) -279.1,2945
NetR19_1: R19.1 R21.2 U1.7 | length 458.8
  Top Layer w4: U1.7@-320,2683.82 -273.82,2683.82 -245,2655 v1(-245,2635) ; U1.7@-300.26,2680.22 cw(c-291.58,2671.54) -291.58,2683.82 cw(c-291.58,2696.1) U1.7@-300.26,2687.42 ; v1@-251,2642.36 ccw(c-261.3,2655) -245,2655 ccw(c-228.7,2655) v1@-239,2642.36 ; v1@-248.47,2639.26 ccw(c-254.44,2646.58) -245,2646.58 ccw(c-235.56,2646.58) v1@-241.53,2639.26
  Bottom Layer w4: R19.1@-305.41,2552.08 ccw(c-321.32,2567.99) -298.82,2567.99 ccw(c-276.32,2567.99) R19.1@-292.23,2552.08 ; R21.2@-305.41,2587.92 cw(c-321.32,2572.01) -298.82,2572.01 cw(c-276.32,2572.01) R21.2@-292.23,2587.92 ; R19.1@-302.58,2549.25 ccw(c-311.66,2558.33) -298.82,2558.33 ccw(c-285.98,2558.33) R19.1@-295.06,2549.25 ; R21.2@-302.58,2590.75 cw(c-311.66,2581.67) -298.82,2581.67 cw(c-285.98,2581.67) R21.2@-295.06,2590.75 ; R19.1@-298.82,2545 R21.2@-298.82,2595 -268.82,2625 -255,2625 v1(-245,2635) ; R21.2@-298.82,2600.81 ccw(c-298.82,2614.84) R21.2@-288.9,2604.92 ; R21.2@-298.82,2604.81 ccw(c-298.82,2628.5) -282.07,2611.75 ; R21.2@-293.5,2595.49 cw(c-281.85,2595.49) R21.2@-290.09,2603.73 ; R21.2@-289.5,2595.49 cw(c-268.19,2595.49) -283.26,2610.56
NetR20_2: R20.2 U1.3 | length 413.4
  Top Layer w4: U1.3@-300.26,2781.01 cw(c-290.63,2771.38) -290.63,2785 ; U1.3@-300.26,2788.2 ccw(c-292.53,2795.94) -292.53,2785 ; v1@-266.48,2890.54 cw(c-266.48,2871.29) -252.86,2884.9 ; v1(-266.48,2900.04) -266.48,2898.52 -239.5,2871.54 -239.5,2838.25 -250,2827.75 -256.85,2827.75 -280,2804.6 -280,2790 -285,2785 U1.3@-319.61,2785 ; v1@-260.98,2900.04 ccw(c-244.02,2900.04) -256.01,2888.05 ; v1@-256.98,2900.04 ccw(c-230.36,2900.04) -249.18,2881.22 ; U1.3@-319.61,2785 U1.3@-320,2784.61 U1.3@-319.61,2785
  Bottom Layer w4: R20.2@-295.06,2891.24 cw(c-285.98,2882.16) -285.98,2895 cw(c-285.98,2907.84) R20.2@-295.06,2898.76 ; R20.2@-292.23,2888.41 cw(c-276.32,2872.5) -276.32,2895 cw(c-276.32,2917.5) R20.2@-292.23,2901.59 ; R20.2@-289.92,2895 ccw(c-289.92,2920.84) v1@-270.59,2903.69 ; -281.02,2895 ccw(c-281.02,2912.95) v1@-267.6,2901.04 ; -277.24,2895 cw(c-277.24,2889.28) v1@-273.19,2893.32 ; v1@-273.58,2906.35 cw(c-298.82,2928.74) R20.2@-298.82,2895 -271.52,2895 v1(-266.48,2900.04)
NetR23_2: R23.2 U1.22 | length 289
  Top Layer w4: U1.22@-79.84,2784.61 12.42,2784.61 v1(61.52,2833.71) ; U1.22@-60.1,2781.01 cw(c-51.42,2772.33) -51.42,2784.61 cw(c-51.42,2796.89) U1.22@-60.1,2788.2 ; v1@52.02,2833.71 cw(c29.09,2833.71) 45.31,2817.49 cw(c61.52,2801.27) v1@61.52,2824.21 ; v1@56.02,2833.71 cw(c42.75,2833.71) 52.14,2824.32 cw(c61.52,2814.93) v1@61.52,2828.21
  Bottom Layer w4: v1(61.52,2833.71) 72.82,2845 ; R23.2@80.71,2840.4 ccw(c72.82,2835.92) 72.82,2845 ; R23.2@80.71,2849.6 cw(c72.82,2854.08) 72.82,2845 ; R23.2@88.82,2845 72.82,2845
NetR24_2: R24.2 U1.23 | length 452.8
  Top Layer w4: U1.23@-79.84,2809.8 9.8,2809.8 48.52,2848.52 v1(48.52,2925.71) ; U1.23@-60.1,2806.21 cw(c-51.42,2797.52) -51.42,2809.8 cw(c-51.42,2822.08) U1.23@-60.1,2813.4 ; v1@41.81,2918.99 cw(c25.59,2902.77) 48.52,2902.77 cw(c71.46,2902.77) v1@55.24,2918.99 ; v1@44.64,2921.82 cw(c35.25,2912.43) 48.52,2912.43 cw(c61.8,2912.43) v1@52.41,2921.82
  Bottom Layer w4: v1(48.52,2925.71) 67.82,2945 ; v1@48.52,2931.21 ccw(c48.52,2944.49) 57.91,2935.1 ccw(c67.3,2925.71) v1@54.02,2925.71 ; v1@48.52,2935.21 ccw(c48.52,2958.14) 64.74,2941.93 ccw(c80.96,2925.71) v1@58.02,2925.71 ; R24.2@81.91,2938.75 ccw(c67.82,2925.99) 67.82,2945 ; R24.2@81.91,2951.25 cw(c67.82,2964.01) 67.82,2945 ; R24.2@84.88,2941.43 ccw(c76.83,2934.15) 76.83,2945 ccw(c76.83,2955.85) R24.2@84.88,2948.57 ; R24.2@88.82,2945 67.82,2945
NetR31_1: R31.1 U3.8 | length 870.4
  MidLayer2 w4: v1(4240.19,1050.04) 4265.19,1075.04 4265.19,1233.37 4274.52,1242.71 4320,1242.71 4327,1235.71 v1(4462.86,1235.71) ; v1@4240.19,1055.54 ccw(c4240.19,1068.82) 4249.58,1059.43 ccw(c4258.97,1050.04) v1@4245.69,1050.04 ; v1@4240.19,1059.54 ccw(c4240.19,1082.48) 4256.41,1066.26 ccw(c4272.63,1050.04) v1@4249.69,1050.04 ; v1@4456.14,1228.99 ccw(c4439.92,1212.77) 4439.92,1235.71 ccw(c4439.92,1258.64) v1@4456.14,1242.43 ; v1@4458.97,1231.82 ccw(c4449.58,1222.43) 4449.58,1235.71 ccw(c4449.58,1248.99) v1@4458.97,1239.6
  Bottom Layer w4: U3.8@4076.5,1046.46 4118.52,1046.46 4122.11,1050.04 v1(4240.19,1050.04) ; U3.8@4105.8,1043.63 cw(c4112.63,1036.8) 4112.63,1046.46 cw(c4112.63,1056.12) U3.8@4105.8,1049.29 ; v1@4233.47,1043.32 ccw(c4217.26,1027.11) 4217.26,1050.04 ccw(c4217.26,1072.98) v1@4233.47,1056.76 ; v1@4236.3,1046.15 ccw(c4226.91,1036.76) 4226.91,1050.04 ccw(c4226.91,1063.32) v1@4236.3,1053.93 ; v1@4462.86,1226.21 cw(c4462.86,1203.27) 4479.07,1219.49 cw(c4495.29,1235.71) v1@4472.36,1235.71 ; v1@4462.86,1230.21 cw(c4462.86,1216.93) 4472.25,1226.32 cw(c4481.64,1235.71) v1@4468.36,1235.71 ; v1(4462.86,1235.71) 4480,1218.56 ; R31.1@4474.84,1208.94 ccw(c4468.45,1218.56) 4480,1218.56 ; R31.1@4480,1201.18 4480,1218.56 ; R31.1@4485.16,1208.94 cw(c4491.55,1218.56) 4480,1218.56
NetR31_2: R31.2 R32.1 | length 173.7
  Bottom Layer w4: R32.1@4473.41,1102.77 ccw(c4457.5,1118.68) 4480,1118.68 ccw(c4502.5,1118.68) R32.1@4486.59,1102.77 ; R31.2@4473.41,1152.23 cw(c4457.5,1136.32) 4480,1136.32 cw(c4502.5,1136.32) R31.2@4486.59,1152.23 ; R32.1@4476.24,1099.94 ccw(c4467.16,1109.02) 4480,1109.02 ccw(c4492.84,1109.02) R32.1@4483.76,1099.94 ; R31.2@4476.24,1155.06 cw(c4467.16,1145.98) 4480,1145.98 cw(c4492.84,1145.98) R31.2@4483.76,1155.06 ; R32.1@4480,1096.18 R31.2@4480,1158.82
NetR32_2: R32.2 R33.2 T1.4 | length 1338
  MidLayer1 w4: v1@4503.28,1393.28 cw(c4487.06,1377.06) 4510,1377.06 cw(c4532.93,1377.06) v1@4516.72,1393.28 ; v1@4506.11,1396.11 cw(c4496.72,1386.72) 4510,1386.72 cw(c4523.28,1386.72) v1@4513.89,1396.11 ; v1(4510,1400) 4510,1361.81 4498.19,1350 4498.19,1121.81 4530,1090 4530,1060 v1(4515,1045)
  Bottom Layer w4: R33.2@4421.59,956.08 ccw(c4405.68,971.99) 4428.18,971.99 ccw(c4450.68,971.99) R33.2@4434.77,956.08 ; R33.2@4424.42,953.25 ccw(c4415.34,962.33) 4428.18,962.33 ccw(c4441.02,962.33) R33.2@4431.94,953.25 ; R33.2@4428.18,949 4428.18,1048.18 4433.82,1053.82 R32.2@4480,1053.82 4488.82,1045 v1(4515,1045) ; v1@4508.28,1038.28 ccw(c4492.06,1022.06) 4492.06,1045 ccw(c4492.06,1067.93) v1@4508.28,1051.72 ; v1(4510,1400) 4550,1400 4565,1385 4960,1385 4968,1393 T1.4@4968,1466 ; v1@4511.11,1041.11 ccw(c4501.72,1031.72) 4501.72,1045 ccw(c4501.72,1058.28) v1@4511.11,1048.89 ; v1@4513.89,1396.11 cw(c4523.28,1386.72) 4523.28,1400 cw(c4523.28,1413.28) v1@4513.89,1403.89 ; v1@4516.72,1393.28 cw(c4532.93,1377.06) 4532.93,1400 cw(c4532.93,1422.93) v1@4516.72,1406.72
NetR33_1: R33.1 R34.1 | length 194.1
  Bottom Layer w4: R34.1@4318.52,939.19 cw(c4318.52,915.5) 4335.27,932.25 ; R34.1@4318.52,943.19 cw(c4318.52,929.16) R34.1@4328.44,939.08 ; R34.1@4318.52,949 4337.52,930 4366.82,930 R33.1@4385.82,949 ; R34.1@4323.84,948.51 ccw(c4335.49,948.51) R34.1@4327.25,940.27 ; R34.1@4327.84,948.51 ccw(c4349.15,948.51) 4334.08,933.44 ; 4369.07,932.25 cw(c4385.82,915.5) R33.1@4385.82,939.19 ; 4370.26,933.44 ccw(c4355.19,948.51) R33.1@4376.5,948.51 ; R33.1@4375.9,939.08 cw(c4385.82,929.16) R33.1@4385.82,943.19 ; R33.1@4377.09,940.27 ccw(c4368.85,948.51) R33.1@4380.5,948.51
NetR35_1: R35.1 R37.1 U3.1 | length 1181.6
  MidLayer1 w4: v1(4355,950) 4423.52,1018.52 v1(4423.52,1192.37) ; v1@4355,955.5 ccw(c4355,968.78) 4364.39,959.39 ccw(c4373.78,950) v1@4360.5,950 ; v1@4355,959.5 ccw(c4355,982.43) 4371.22,966.22 ccw(c4387.43,950) v1@4364.5,950 ; v1@4416.81,1185.66 cw(c4400.59,1169.44) 4423.52,1169.44 cw(c4446.46,1169.44) v1@4430.24,1185.66 ; v1@4419.64,1188.49 cw(c4410.25,1179.1) 4423.52,1179.1 cw(c4436.8,1179.1) v1@4427.41,1188.49
  MidLayer2 w4: v1(4240,950) v1(4355,950) ; v1@4243.89,946.11 cw(c4253.28,936.72) 4253.28,950 cw(c4253.28,963.28) v1@4243.89,953.89 ; v1@4246.72,943.28 cw(c4262.93,927.06) 4262.93,950 cw(c4262.93,972.93) v1@4246.72,956.72 ; v1@4348.28,943.28 ccw(c4332.06,927.06) 4332.06,950 ccw(c4332.06,972.93) v1@4348.28,956.72 ; v1@4351.11,946.11 ccw(c4341.72,936.72) 4341.72,950 ccw(c4341.72,963.28) v1@4351.11,953.89
  Bottom Layer w4: R37.1@4208.86,949 4209.86,950 v1(4240,950) ; R37.1@4212.62,945.73 cw(c4222.93,935.42) 4222.93,950 ; R37.1@4212.62,953.25 ccw(c4220.48,961.11) 4220.48,950 ; R37.1@4215.45,942.9 cw(c4232.58,925.77) v1@4232.58,950 ; R37.1@4215.45,956.08 ccw(c4230.13,970.76) v1@4230.13,950 ; v1@4233.28,943.28 ccw(c4217.06,927.06) 4217.06,950 ccw(c4217.06,972.93) v1@4233.28,956.72 ; v1@4236.11,946.11 ccw(c4226.72,936.72) 4226.72,950 ccw(c4226.72,963.28) v1@4236.11,953.89 ; U3.1@4295,1200 4340.19,1200 4341.37,1201.18 4414.72,1201.18 ; U3.1@4324.31,1197.17 cw(c4331.14,1190.34) 4331.14,1200 cw(c4331.14,1209.66) U3.1@4324.31,1202.83 ; 4379.33,1201.18 cw(c4379.33,1148.18) v1@4416.81,1185.66 ; R35.1@4387.92,1194.59 ccw(c4372.01,1178.68) 4372.01,1201.18 ccw(c4372.01,1223.68) R35.1@4387.92,1207.77 ; R35.1@4388.99,1201.18 cw(c4388.99,1157.84) v1@4419.64,1188.49 ; R35.1@4390.75,1197.42 ccw(c4381.67,1188.34) 4381.67,1201.18 ccw(c4381.67,1214.02) R35.1@4390.75,1204.94 ; R35.1@4398.64,1201.18 cw(c4398.64,1167.49) v1@4422.46,1191.31 ; R35.1@4401.23,1201.18 cw(c4401.23,1182.16) v1@4418.52,1190.08 ; 4407.47,1201.18 cw(c4407.47,1185.02) v1@4422.16,1191.75 ; 4408.3,1201.18 cw(c4408.3,1177.15) v1@4425.29,1194.14 ; 4413.7,1201.18 cw(c4413.7,1187.87) v1@4425.8,1193.42 ; v1@4414.89,1188.42 ccw(c4395,1179.31) R35.1@4395,1201.18 4414.72,1201.18 ; v1(4423.52,1192.37) 4414.72,1201.18
NetR35_2: R35.2 R38.2 U3.2 U3.3 | length 547.3
  Bottom Layer w4: 4261.86,1148.67 cw(c4294.26,1148.67) U3.2@4271.35,1171.58 ; 4261.86,1155.21 ccw(c4274.85,1155.21) U3.3@4265.7,1145.98 ; 4261.86,1158.33 cw(c4284.6,1158.33) U3.2@4268.52,1174.41 ; 4261.86,1164.81 ccw(c4284.37,1164.81) U3.3@4268.52,1148.82 ; 4261.86,1167.98 cw(c4274.95,1167.98) U3.2@4265.69,1177.24 ; U3.3@4271.34,1151.66 cw(c4293.89,1174.41) 4261.86,1174.41 ; U3.2@4295,1174.41 4261.86,1174.41 ; U3.3@4324.31,1145.99 cw(c4331.14,1139.16) 4331.14,1148.82 cw(c4331.14,1158.48) U3.3@4324.31,1151.65 ; R35.2@4387.92,1152.23 ccw(c4372.01,1136.32) 4372.01,1158.82 ccw(c4372.01,1181.32) R35.2@4387.92,1165.41 ; R38.2@4388.41,1102.77 ccw(c4372.5,1118.68) 4395,1118.68 ccw(c4417.5,1118.68) R38.2@4401.59,1102.77 ; R35.2@4388.41,1152.23 cw(c4372.5,1136.32) 4395,1136.32 cw(c4417.5,1136.32) R35.2@4401.59,1152.23 ; R35.2@4390.75,1155.06 ccw(c4381.67,1145.98) 4381.67,1158.82 ccw(c4381.67,1171.66) R35.2@4390.75,1162.58 ; R38.2@4391.24,1099.94 ccw(c4382.16,1109.02) 4395,1109.02 ccw(c4407.84,1109.02) R38.2@4398.76,1099.94 ; R35.2@4391.24,1155.06 cw(c4382.16,1145.98) 4395,1145.98 cw(c4407.84,1145.98) R35.2@4398.76,1155.06 ; R38.2@4395,1096.18 R35.2@4395,1158.82 4351.63,1158.82 4341.64,1148.82 U3.3@4295,1148.82 4261.86,1148.82 4261.86,1174.41
NetR40_1: R40.1 U4.4 | length 855.4
  MidLayer1 w4: v1@7865.19,2482.21 cw(c7865.19,2459.27) 7881.41,2475.49 cw(c7897.63,2491.71) v1@7874.69,2491.71 ; v1@7865.19,2486.21 cw(c7865.19,2472.93) 7874.58,2482.32 cw(c7883.97,2491.71) v1@7870.69,2491.71 ; v1(7865.19,2491.71) 7940.19,2416.71 7940.19,2293.04 7974.86,2258.37 7974.86,2109.86 7956.71,2091.71 v1(7873.52,2091.71) ; v1@7877.41,2087.82 cw(c7886.8,2078.43) 7886.8,2091.71 cw(c7886.8,2104.99) v1@7877.41,2095.6 ; v1@7880.24,2084.99 cw(c7896.46,2068.77) 7896.46,2091.71 cw(c7896.46,2114.64) v1@7880.24,2098.43
  Bottom Layer w4: v1@7858.47,2484.99 cw(c7842.26,2468.77) 7865.19,2468.77 cw(c7888.13,2468.77) v1@7871.91,2484.99 ; v1@7861.3,2487.82 cw(c7851.91,2478.43) 7865.19,2478.43 cw(c7878.47,2478.43) v1@7869.08,2487.82 ; v1(7865.19,2491.71) 7865.19,2463.45 7873.52,2455.12 ; v1(7873.52,2091.71) 7887.82,2091.71 7889.52,2090 ; U4.4@7884.62,2449.41 ccw(c7873.52,2441.48) 7873.52,2455.12 ; U4.4@7884.62,2460.82 cw(c7873.53,2468.75) 7873.53,2455.12 ; U4.4@7892.6,2455.12 7873.52,2455.12 ; R40.1@7901.52,2084.21 ccw(c7889.53,2074.69) 7889.53,2090 ; R40.1@7901.52,2095.79 cw(c7889.53,2105.31) 7889.53,2090 ; R40.1@7908.82,2090 7889.52,2090
NetR53_1: R53.1 R56.2 | length 90.3
  Bottom Layer w12: R53.1@2275.06,5734.25 ccw(c2265.98,5743.33) 2278.82,5743.33 ccw(c2291.66,5743.33) R53.1@2282.58,5734.25 ; R56.2@2275.06,5775.75 cw(c2265.98,5766.67) 2278.82,5766.67 cw(c2291.66,5766.67) R56.2@2282.58,5775.75 ; R53.1@2278.82,5730 R56.2@2278.82,5780
NetR53_2: R53.2 U5.28 | length 96.8
  Bottom Layer w12: U5.28@2311.65,5657.32 2311.65,5705.47 2321.18,5715 R53.2@2321.18,5730 ; R53.2@2317.42,5725.75 cw(c2308.34,5716.67) 2321.18,5716.67 cw(c2334.02,5716.67) R53.2@2324.94,5725.75
NetR98_1: R98.1 U45.3 | length 205.1
  Bottom Layer w4: U45.3@-202.85,2063.31 -202.85,2130.52 -183.68,2149.69 R98.1@-183.68,2205 ; R98.1@-190.27,2197.92 cw(c-206.18,2182.01) -183.68,2182.01 cw(c-161.18,2182.01) R98.1@-177.09,2197.92 ; R98.1@-187.44,2200.75 cw(c-196.52,2191.67) -183.68,2191.67 cw(c-170.84,2191.67) R98.1@-179.92,2200.75
NetR110_2: R110.2 U18.5 | length 169.8
  Bottom Layer w4: U18.5@7447.24,495 7472,495 ; U18.5@7463.74,489.84 cw(c7472,485.81) 7472,495 ; U18.5@7463.74,500.16 ccw(c7472,504.19) 7472,495 ; 7477.07,451.75 ccw(c7493.82,468.5) R110.2@7493.82,444.81 ; 7478.26,450.56 cw(c7463.19,435.49) R110.2@7484.5,435.49 ; R110.2@7483.9,444.92 ccw(c7493.82,454.84) R110.2@7493.82,440.81 ; R110.2@7485.09,443.73 cw(c7476.85,435.49) R110.2@7488.5,435.49 ; R110.2@7493.82,435 7475,453.82 7475,492 7472,495
NetR112_2: R112.2 U19.13 | length 375
  MidLayer2 w4: v1(7224.19,591.71) 7284.36,591.71 v5(7311.73,564.34) ; v1@7228.08,587.82 cw(c7237.47,578.43) 7237.47,591.71 cw(c7237.47,604.99) v1@7228.08,595.6 ; v1@7230.91,584.99 cw(c7247.13,568.77) 7247.13,591.71 cw(c7247.13,614.64) v1@7230.91,598.43 ; v5@7303.73,564.34 ccw(c7284.42,564.34) 7298.08,578 ccw(c7311.73,591.65) v5@7311.73,572.34
  Bottom Layer w4: R112.2@7199.94,591.24 cw(c7209.02,582.16) 7209.02,595 cw(c7209.02,607.84) R112.2@7199.94,598.76 ; R112.2@7202.77,588.41 cw(c7218.68,572.5) 7218.68,595 cw(c7218.68,617.5) R112.2@7202.77,601.59 ; R112.2@7204.94,595 cw(c7204.94,575.03) v1@7220.03,588.11 ; 7209.2,595 ccw(c7209.2,606.7) v1@7217.47,598.43 ; v1@7217.01,585.49 ccw(c7196.18,567.44) R112.2@7196.18,595 7220.9,595 v1(7224.19,591.71)
  Bottom Layer w8: v5@7307.49,568.58 ccw(c7297.25,578.82) 7311.73,578.82 ccw(c7326.22,578.82) v5@7315.97,568.58 ; v5(7311.73,564.34) U19.13@7311.73,595.67
NetR113_2: R113.2 U19.15 | length 254.1
  Bottom Layer w4: R113.2@7147.23,702.92 cw(c7131.32,687.01) 7153.82,687.01 cw(c7176.32,687.01) R113.2@7160.41,702.92 ; R113.2@7150.06,705.75 cw(c7140.98,696.67) 7153.82,696.67 cw(c7166.66,696.67) R113.2@7157.58,705.75 ; R113.2@7153.82,710 7153.82,650.08 7181.86,622.05 U19.15@7265.67,622.05 ; U19.15@7251.91,619.22 ccw(c7245.08,612.39) 7245.08,622.05 ccw(c7245.08,631.7) U19.15@7251.91,624.88
NetR114_2: R114.2 U19.16 | length 297.7
  Bottom Layer w8: R114.2@7153.82,812.19 cw(c7153.82,793.33) 7167.15,806.67 ; R114.2@7153.82,820 7175,798.82 7175,655 7188.27,641.73 U19.16@7265.67,641.73 ; R114.2@7161.14,819.51 ccw(c7177.62,819.51) 7165.97,807.85
NetR116_2: R116.2 U21.38 | length 260.3
  Bottom Layer w4: R116.2@4921.18,5740 4961.18,5780 5048.12,5780 5056.42,5771.71 U21.38@5056.42,5737.32 ; R116.2@4921.18,5745.81 ccw(c4921.18,5759.84) R116.2@4931.1,5749.92 ; R116.2@4921.18,5749.81 ccw(c4921.18,5773.5) 4937.93,5756.75 ; R116.2@4926.5,5740.49 cw(c4938.15,5740.49) R116.2@4929.91,5748.73 ; R116.2@4930.5,5740.49 cw(c4951.81,5740.49) 4936.74,5755.56 ; U21.38@5053.59,5763.68 ccw(c5046.76,5770.51) 5056.42,5770.51 ccw(c5066.07,5770.51) U21.38@5059.25,5763.68
NetR142_1: R142.1 U26.12 | length 688.2
  Top Layer w4: U26.12@-30.87,5000 40,5000 60,4980 86.82,4980 v1(106.86,5000.04) ; U26.12@6.71,4995.89 cw(c16.63,4985.97) 16.63,5000 cw(c16.63,5014.03) U26.12@6.71,5004.11 ; U26.12@9.54,4993.06 cw(c26.28,4976.31) 26.28,5000 cw(c26.28,5023.69) U26.12@9.54,5006.94 ; v1@97.36,5000.04 cw(c74.42,5000.04) 90.64,4983.82 cw(c106.86,4967.61) v1@106.86,4990.54 ; v1@101.36,5000.04 cw(c88.08,5000.04) 97.47,4990.65 cw(c106.86,4981.26) v1@106.86,4994.54
  MidLayer2 w4: v1@100.14,5006.76 ccw(c83.92,5022.98) 106.86,5022.98 ccw(c129.79,5022.98) v1@113.57,5006.76 ; v1@102.97,5003.93 ccw(c93.58,5013.32) 106.86,5013.32 ccw(c120.14,5013.32) v1@110.75,5003.93 ; v1(106.86,5000.04) 106.86,5176.86 125,5195 ; v1@119,5207.64 cw(c108.7,5195) 125,5195 ; v1@121.53,5210.74 cw(c115.56,5203.42) 125,5203.42 cw(c134.44,5203.42) v1@128.47,5210.74 ; v1(125,5215) 125,5195 ; v1@131,5207.64 ccw(c141.3,5195) 125,5195
  Bottom Layer w4: R142.1@108.64,5245.8 125,5229.44 v1(125,5215) ; R142.1@108.7,5235.99 cw(c108.84,5212.79) 125.25,5229.19 ; R142.1@108.67,5239.99 cw(c108.76,5226.24) R142.1@118.48,5235.96 ; R142.1@113.96,5245.3 ccw(c125.61,5245.3) R142.1@117.37,5237.06 ; R142.1@117.96,5245.3 ccw(c139.27,5245.3) 124.2,5230.24
NetR149_2: R149.2 U28.2 U29.5 | length 1233.7
  Top Layer w4: R149.2@369.59,5407.92 cw(c353.68,5392.01) 376.18,5392.01 cw(c398.68,5392.01) R149.2@382.77,5407.92 ; R149.2@372.42,5410.75 cw(c363.34,5401.67) 376.18,5401.67 cw(c389.02,5401.67) R149.2@379.94,5410.75 ; v1@378.28,5356.72 ccw(c362.06,5372.93) 385,5372.93 ccw(c407.93,5372.93) v1@391.72,5356.72 ; R149.2@379.94,5411.24 cw(c389.02,5402.16) 389.02,5415 cw(c389.02,5427.84) R149.2@379.94,5418.76 ; v1@381.11,5353.89 ccw(c371.72,5363.28) 385,5363.28 ccw(c398.28,5363.28) v1@388.89,5353.89 ; R149.2@382.77,5408.41 cw(c398.68,5392.5) 398.68,5415 cw(c398.68,5437.5) R149.2@382.77,5421.59 ; v1(385,5350) 385,5380 376.18,5388.82 R149.2@376.18,5415 421.54,5415 456.86,5379.68 U28.2@509.29,5379.69 ; U28.2@479,5376.86 ccw(c472.17,5370.03) 472.17,5379.68 ccw(c472.17,5389.34) U28.2@479,5382.51 ; U29.5@867.83,5354.41 880.59,5354.41 v1(905,5330) ; U29.5@876.69,5348.54 cw(c876.69,5324.94) 893.37,5341.63 ; U29.5@876.69,5352.54 cw(c876.69,5338.6) 886.55,5348.45 ; U29.5@882.57,5354.41 ccw(c887.34,5354.41) U29.5@883.96,5351.04 ; v1@895.5,5330 ccw(c872.56,5330) 888.78,5346.22 ccw(c905,5362.43) v1@905,5339.5 ; v1@899.5,5330 ccw(c886.22,5330) 895.61,5339.39 ccw(c905,5348.78) v1@905,5335.5
  MidLayer1 w4: v1(385,5350) 800,5350 865,5285 890,5285 905,5300 v1(905,5330) ; v1@388.89,5346.11 cw(c398.28,5336.72) 398.28,5350 cw(c398.28,5363.28) v1@388.89,5353.89 ; v1@391.72,5343.28 cw(c407.93,5327.06) 407.93,5350 cw(c407.93,5372.93) v1@391.72,5356.72 ; v1@898.28,5323.28 cw(c882.06,5307.06) 905,5307.06 cw(c927.93,5307.06) v1@911.72,5323.28 ; v1@901.11,5326.11 cw(c891.72,5316.72) 905,5316.72 cw(c918.28,5316.72) v1@908.89,5326.11